# Altium PCB Pod_Islands_Panel.PcbDoc (part 4 of 10)
Units mm, origin at the board's own origin, x right, y up, seen from the top; angles counter-clockwise.
Board outline 95.7 x 83.7 mm, 6 copper layers (Top Layer, Inner1, Inner2, Inner3, Inner4, Bottom Layer), stack 0.82 mm thick; 1100 components, 940 nets, 4944 pads, 3680 vias.
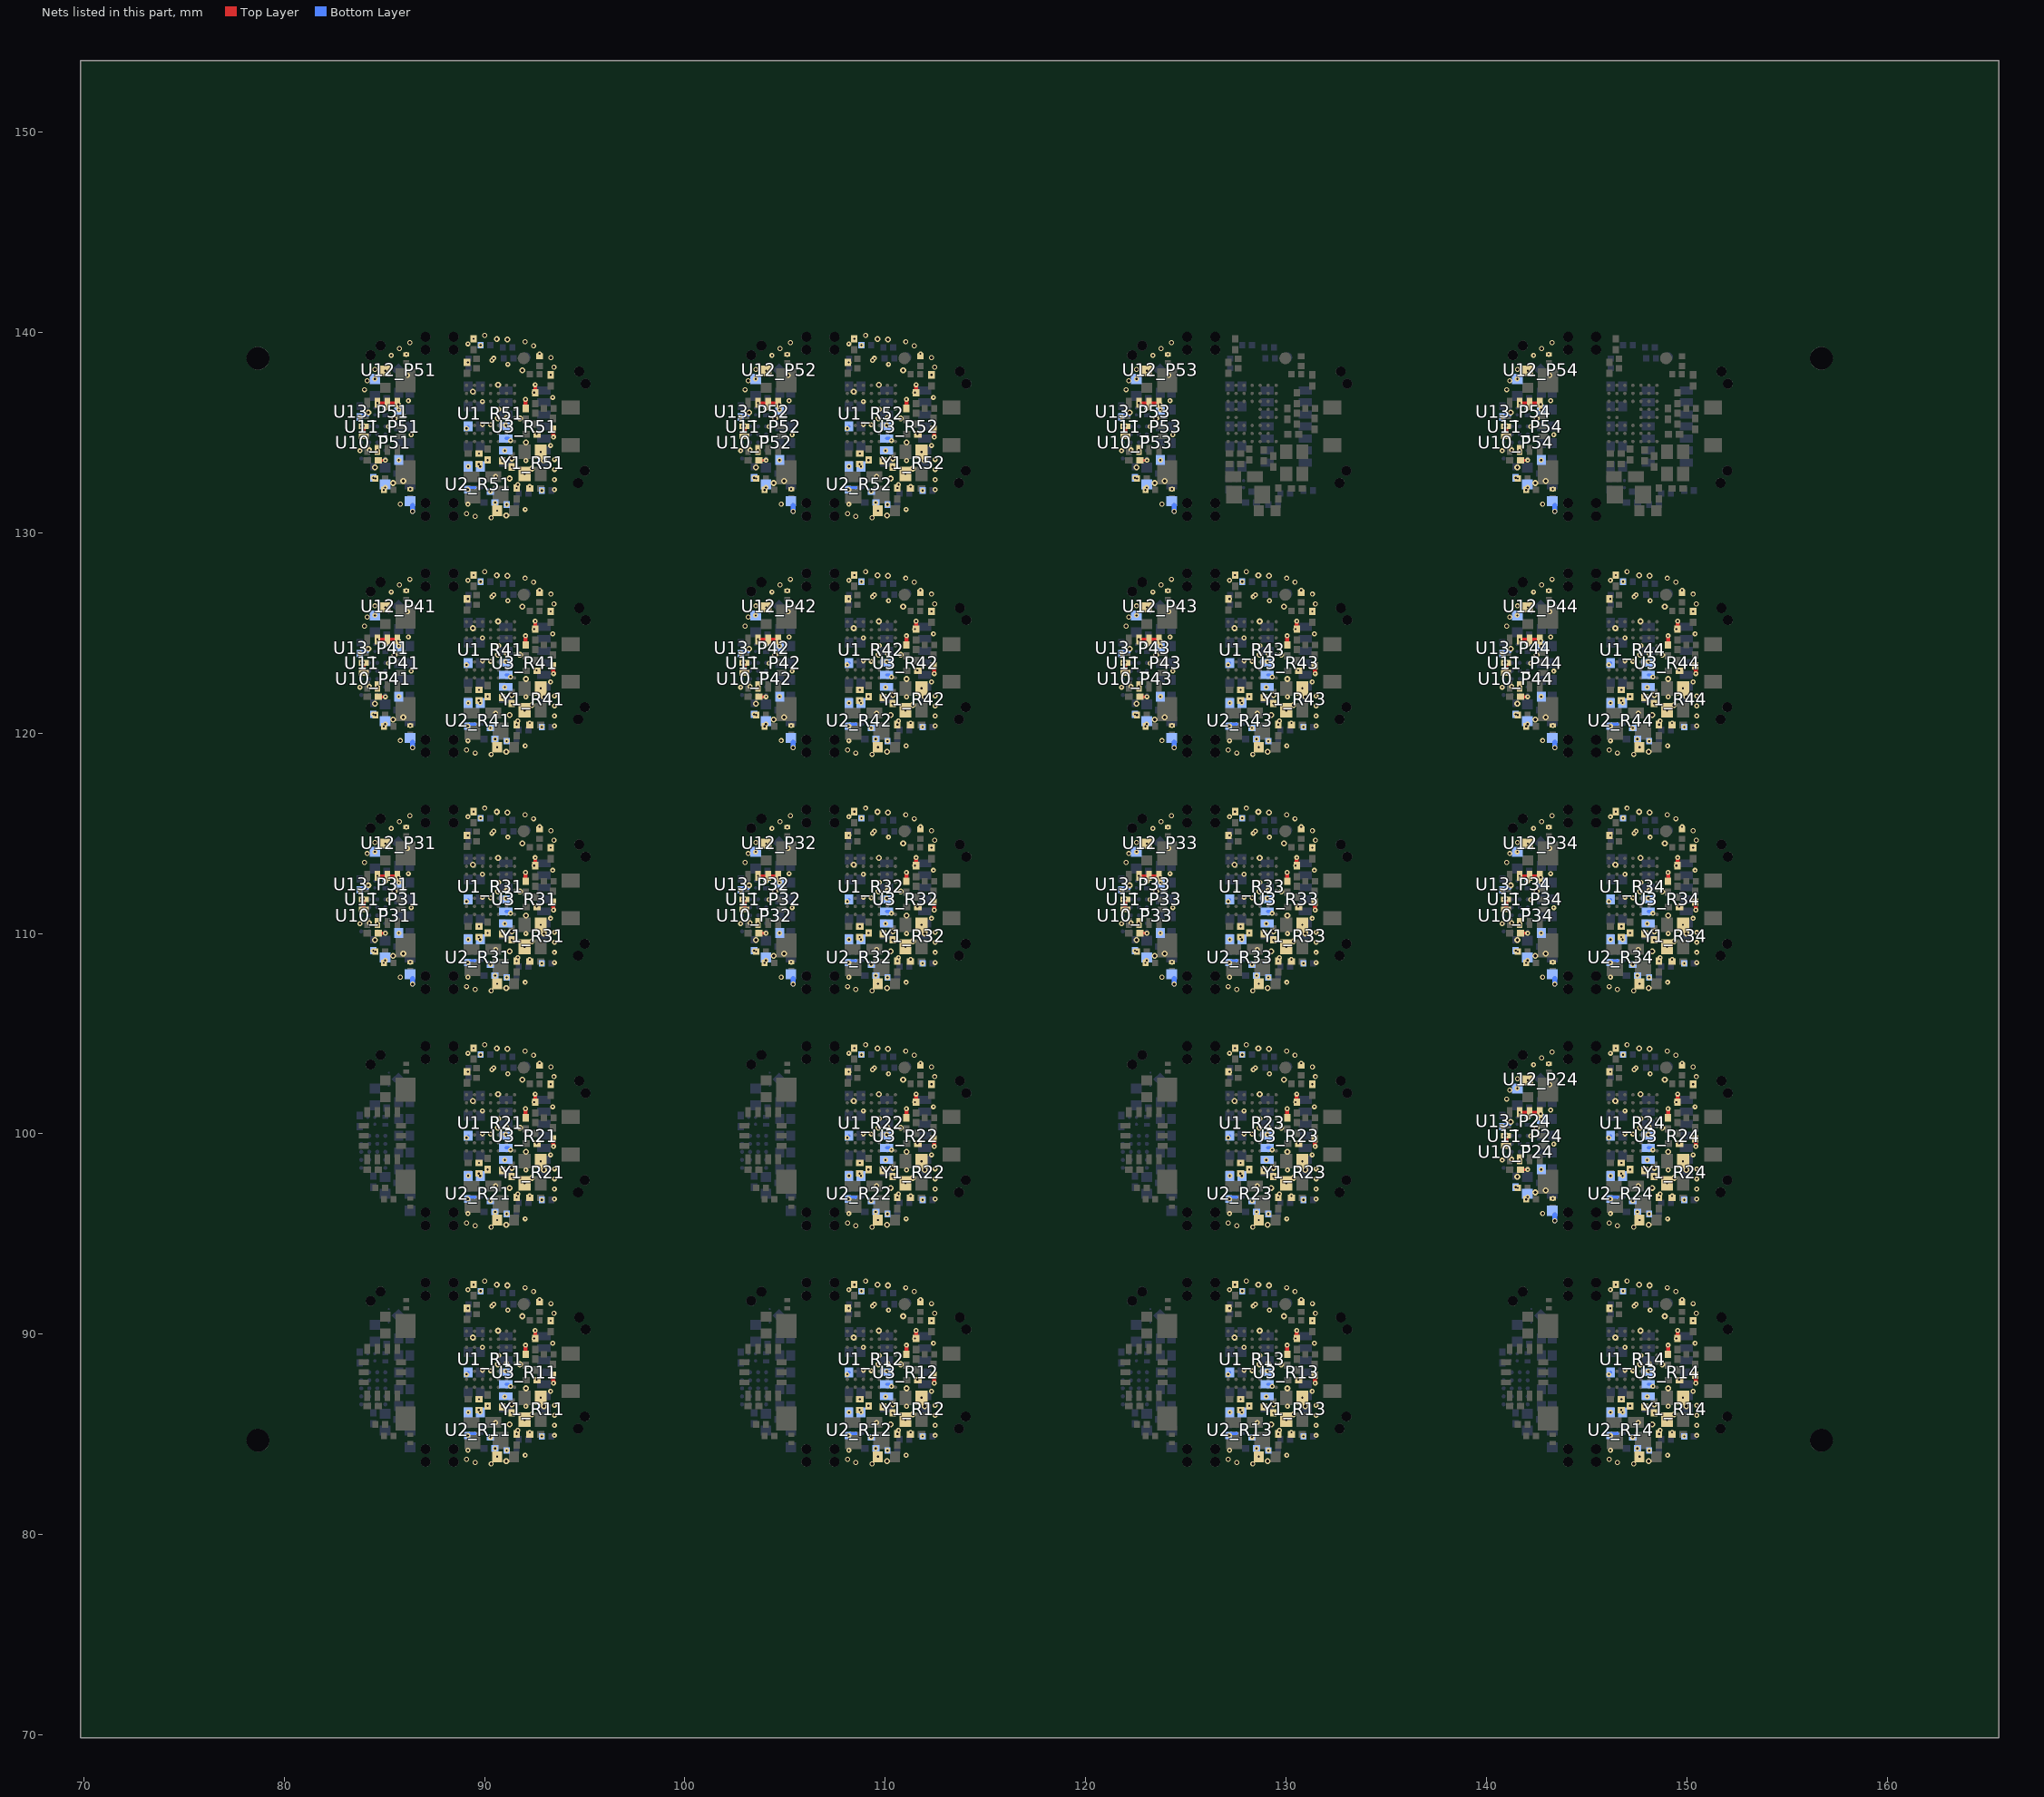
[diagram p8: the nets of this part, all layers, seen from the top]

## Via types
v1: diameter 0.249, hole 0.102, Top Layer to Inner1, 920 vias
v2: diameter 0.249, hole 0.102, Inner1 to Bottom Layer, 740 vias
v3: diameter 0.249, hole 0.102, Top Layer to Inner4, 580 vias
v4: diameter 0.249, hole 0.152, Top Layer to Bottom Layer, 540 vias
v5: diameter 0.249, hole 0.102, Inner4 to Bottom Layer, 520 vias
v6: diameter 0.3, hole 0.152, Inner1 to Inner4, 380 vias

## Nets (pads, with @x,y where several pads share a name; then routed paths per layer and width w, separated by ;. In a path a pad name is that pad's centre, name@x,y a point inside that pad or via, vN(x,y) a via of type N, cw(c..) or ccw(c..) an arc to the next point about the centre after c; other vN are vias at no path point) (continued)
GND_P24: C50_P24.2 C51_P24.2 C52_P24.2 C53_P24.2 C56_P24.2 C60_P24.2 C63_P24.2 D10_P24.2 D12_P24.2 D13_P24.2 pad.JP6@142.723,98.221 pad.JP9@142.723,100.741 R50_P24.2 TH5_P24.2 U10_P24.A4 U10_P24.D3 U11_P24.1 U11_P24.2 U11_P24.3 U11_P24.6 U11_P24.7 U11_P24.9 U12_P24.4 U13_P24.B2 | length 2.5
  Top Layer w0.15: v1(141.65,101.075) U11_P24.2@142.15,101.075 U11_P24.1@142.651,101.075 ; C60_P24.2@141.696,98.21 v1(142.05,98.21)
  Top Layer w0.2: U11_P24.7@140.974,99.399 140.974,99.899 v1(140.974,99.929)
  Bottom Layer w0.15: 140.942,100.476 U13_P24.B2@141.175,100.475 ; U10_P24.D3@141.251,98.7 v5(141.251,98.73) ; v5(142.051,100.8) D10_P24.2@142.051,100.849
  Bottom Layer w0.25: v4(143.404,95.667) C52_P24.2@143.404,95.95
  other v1: 141.977,96.729 143.301,96.77 141.558,97.301 140.78,98.687 141.651,98.724 143.344,99.487 142.2,99.887 142.7,101 143.2,101.187 142.051,102.677
  other v3: 142.345,103.443 143.1,103.501
  other v4: 142.8,96.02 141.004,101.736 141.15,102.187 141.534,102.745 142.75,103.787 143.268,104.076
  other v5: 142.041,96.85 141.449,97.336 142.724,98.22 140.85,99.899 140.779,100.367 142.724,100.74 141.531,102.269 143.15,102.45
  other v6: 142.431,97.076 142.944,97.185 141.535,97.864 142.499,100.289 141.2,100.6
GND_P31: C50_P31.2 C51_P31.2 C52_P31.2 C53_P31.2 C56_P31.2 C60_P31.2 C63_P31.2 D10_P31.2 D12_P31.2 D13_P31.2 pad.JP6@85.723,110.019 pad.JP9@85.723,112.539 R50_P31.2 TH5_P31.2 U10_P31.A4 U10_P31.D3 U11_P31.1 U11_P31.2 U11_P31.3 U11_P31.6 U11_P31.7 U11_P31.9 U12_P31.4 U13_P31.B2 | length 2.5
  Top Layer w0.15: v1(84.65,112.875) U11_P31.2@85.15,112.875 U11_P31.1@85.651,112.875 ; C60_P31.2@84.696,110.01 v1(85.05,110.01)
  Top Layer w0.2: U11_P31.7@83.975,111.2 U11_P31.6@83.975,111.7 v1(83.974,111.729)
  Bottom Layer w0.15: 83.942,112.276 U13_P31.B2@84.175,112.275 ; U10_P31.D3@84.251,110.5 v5(84.251,110.53) ; v5(85.051,112.6) D10_P31.2@85.051,112.649
  Bottom Layer w0.25: v4(86.404,107.467) C52_P31.2@86.404,107.75
  other v1: 84.977,108.529 86.301,108.57 84.558,109.101 83.78,110.487 84.651,110.525 86.344,111.287 85.2,111.687 85.7,112.8 86.2,112.987 85.051,114.477
  other v3: 85.345,115.243 86.1,115.301
  other v4: 85.8,107.82 84.004,113.536 84.15,113.987 84.534,114.545 85.75,115.587 86.268,115.876
  other v5: 85.041,108.65 84.449,109.136 85.724,110.02 83.85,111.699 83.779,112.167 85.724,112.54 84.531,114.069 86.15,114.25
  other v6: 85.431,108.876 85.944,108.985 84.535,109.664 85.499,112.089 84.2,112.4
GND_P32: C50_P32.2 C51_P32.2 C52_P32.2 C53_P32.2 C56_P32.2 C60_P32.2 C63_P32.2 D10_P32.2 D12_P32.2 D13_P32.2 pad.JP6@104.725,110.019 pad.JP9@104.725,112.539 R50_P32.2 TH5_P32.2 U10_P32.A4 U10_P32.D3 U11_P32.1 U11_P32.2 U11_P32.3 U11_P32.6 U11_P32.7 U11_P32.9 U12_P32.4 U13_P32.B2 | length 2.5
  Top Layer w0.15: v1(103.65,112.875) U11_P32.2@104.15,112.875 U11_P32.1@104.65,112.875 ; C60_P32.2@103.694,110.01 v1(104.05,110.01)
  Top Layer w0.2: U11_P32.7@102.975,111.2 U11_P32.6@102.975,111.7 v1(102.974,111.729)
  Bottom Layer w0.15: 102.942,112.276 U13_P32.B2@103.175,112.275 ; U10_P32.D3@103.25,110.5 v5(103.251,110.53) ; v5(104.051,112.6) D10_P32.2@104.05,112.65
  Bottom Layer w0.25: v4@105.404,107.467 C52_P32.2@105.404,107.75
  other v1: 103.977,108.529 105.301,108.57 103.558,109.101 102.78,110.487 103.65,110.525 105.344,111.287 104.2,111.687 104.7,112.8 105.2,112.987 104.051,114.477
  other v3: 104.345,115.243 105.1,115.301
  other v4: 105.404,107.467 104.8,107.82 103.004,113.536 103.15,113.987 103.534,114.545 104.75,115.587 105.268,115.876
  other v5: 104.041,108.65 103.449,109.136 104.724,110.02 102.85,111.699 102.779,112.167 104.724,112.54 103.531,114.069 105.15,114.25
  other v6: 104.431,108.876 104.944,108.985 103.535,109.664 104.499,112.089 103.2,112.4
GND_P33: C50_P33.2 C51_P33.2 C52_P33.2 C53_P33.2 C56_P33.2 C60_P33.2 C63_P33.2 D10_P33.2 D12_P33.2 D13_P33.2 pad.JP6@123.724,110.019 pad.JP9@123.724,112.539 R50_P33.2 TH5_P33.2 U10_P33.A4 U10_P33.D3 U11_P33.1 U11_P33.2 U11_P33.3 U11_P33.6 U11_P33.7 U11_P33.9 U12_P33.4 U13_P33.B2 | length 2.5
  Top Layer w0.15: v1(122.65,112.875) U11_P33.2@123.15,112.875 U11_P33.1@123.65,112.875 ; C60_P33.2@122.694,110.01 v1(123.05,110.01)
  Top Layer w0.2: U11_P33.7@121.974,111.199 121.974,111.699 v1(121.974,111.729)
  Bottom Layer w0.15: 121.942,112.276 U13_P33.B2@122.175,112.275 ; U10_P33.D3@122.25,110.5 v5(122.251,110.53) ; v5(123.051,112.6) D10_P33.2@123.05,112.65
  Bottom Layer w0.25: v4(124.404,107.467) C52_P33.2@124.404,107.75
  other v1: 122.977,108.529 124.301,108.57 122.558,109.101 121.78,110.487 122.649,110.525 124.344,111.287 123.2,111.687 123.7,112.8 124.2,112.987 123.051,114.477
  other v3: 123.345,115.243 124.1,115.301
  other v4: 123.8,107.82 122.004,113.536 122.15,113.987 122.534,114.545 123.75,115.587 124.268,115.876
  other v5: 123.041,108.65 122.449,109.136 123.724,110.02 121.85,111.699 121.779,112.167 123.724,112.54 122.531,114.069 124.15,114.25
  other v6: 123.431,108.876 123.944,108.985 122.535,109.664 123.499,112.089 122.2,112.4
GND_P34: C50_P34.2 C51_P34.2 C52_P34.2 C53_P34.2 C56_P34.2 C60_P34.2 C63_P34.2 D10_P34.2 D12_P34.2 D13_P34.2 pad.JP6@142.723,110.019 pad.JP9@142.723,112.539 R50_P34.2 TH5_P34.2 U10_P34.A4 U10_P34.D3 U11_P34.1 U11_P34.2 U11_P34.3 U11_P34.6 U11_P34.7 U11_P34.9 U12_P34.4 U13_P34.B2 | length 2.5
  Top Layer w0.15: v1(141.65,112.875) U11_P34.2@142.15,112.875 U11_P34.1@142.651,112.875 ; C60_P34.2@141.696,110.01 v1(142.05,110.01)
  Top Layer w0.2: U11_P34.7@140.975,111.2 U11_P34.6@140.975,111.7 v1(140.974,111.729)
  Bottom Layer w0.15: 140.942,112.276 U13_P34.B2@141.175,112.275 ; U10_P34.D3@141.251,110.5 v5(141.251,110.53) ; v5(142.051,112.6) D10_P34.2@142.051,112.649
  Bottom Layer w0.25: v4(143.404,107.467) C52_P34.2@143.404,107.75
  other v1: 141.977,108.529 143.301,108.57 141.558,109.101 140.78,110.487 141.651,110.525 143.344,111.287 142.2,111.687 142.7,112.8 143.2,112.987 142.051,114.477
  other v3: 142.345,115.243 143.1,115.301
  other v4: 142.8,107.82 141.004,113.536 141.15,113.987 141.534,114.545 142.75,115.587 143.268,115.876
  other v5: 142.041,108.65 141.449,109.136 142.724,110.02 140.85,111.699 140.779,112.167 142.724,112.54 141.531,114.069 143.15,114.25
  other v6: 142.431,108.876 142.944,108.985 141.535,109.664 142.499,112.089 141.2,112.4
GND_P41: C50_P41.2 C51_P41.2 C52_P41.2 C53_P41.2 C56_P41.2 C60_P41.2 C63_P41.2 D10_P41.2 D12_P41.2 D13_P41.2 pad.JP6@85.723,121.82 pad.JP9@85.723,124.34 R50_P41.2 TH5_P41.2 U10_P41.A4 U10_P41.D3 U11_P41.1 U11_P41.2 U11_P41.3 U11_P41.6 U11_P41.7 U11_P41.9 U12_P41.4 U13_P41.B2 | length 2.5
  Top Layer w0.15: v1(84.65,124.675) U11_P41.2@85.15,124.675 U11_P41.1@85.651,124.675 ; C60_P41.2@84.696,121.81 v1(85.05,121.81)
  Top Layer w0.2: U11_P41.7@83.975,123 U11_P41.6@83.975,123.5 v1(83.974,123.529)
  Bottom Layer w0.15: 83.942,124.076 U13_P41.B2@84.175,124.076 ; U10_P41.D3@84.251,122.3 v5(84.251,122.33) ; v5(85.051,124.4) D10_P41.2@85.051,124.449
  Bottom Layer w0.25: v4(86.404,119.267) C52_P41.2@86.404,119.55
  other v1: 84.977,120.329 86.301,120.37 84.558,120.901 83.78,122.287 84.651,122.326 86.344,123.087 85.2,123.487 85.7,124.6 86.2,124.787 85.051,126.277
  other v3: 85.345,127.043 86.1,127.101
  other v4: 85.8,119.62 84.004,125.336 84.15,125.787 84.534,126.345 85.75,127.387 86.268,127.676
  other v5: 85.041,120.45 84.449,120.936 85.724,121.82 83.85,123.499 83.779,123.967 85.724,124.34 84.531,125.869 86.15,126.05
  other v6: 85.431,120.676 85.944,120.785 84.535,121.464 85.499,123.889 84.2,124.2
GND_P42: C50_P42.2 C51_P42.2 C52_P42.2 C53_P42.2 C56_P42.2 C60_P42.2 C63_P42.2 D10_P42.2 D12_P42.2 D13_P42.2 pad.JP6@104.725,121.82 pad.JP9@104.725,124.34 R50_P42.2 TH5_P42.2 U10_P42.A4 U10_P42.D3 U11_P42.1 U11_P42.2 U11_P42.3 U11_P42.6 U11_P42.7 U11_P42.9 U12_P42.4 U13_P42.B2 | length 2.5
  Top Layer w0.15: v1(103.65,124.675) U11_P42.2@104.15,124.675 U11_P42.1@104.65,124.675 ; C60_P42.2@103.694,121.81 v1(104.05,121.81)
  Top Layer w0.2: U11_P42.7@102.975,123 U11_P42.6@102.975,123.5 v1(102.974,123.529)
  Bottom Layer w0.15: 102.942,124.076 U13_P42.B2@103.175,124.076 ; U10_P42.D3@103.25,122.3 v5(103.251,122.33) ; v5(104.051,124.4) D10_P42.2@104.05,124.45
  Bottom Layer w0.25: v4@105.404,119.267 C52_P42.2@105.404,119.55
  other v1: 103.977,120.329 105.301,120.37 103.558,120.901 102.78,122.287 103.65,122.326 105.344,123.087 104.2,123.487 104.7,124.6 105.2,124.787 104.051,126.277
  other v3: 104.345,127.043 105.1,127.101
  other v4: 105.404,119.267 104.8,119.62 103.004,125.336 103.15,125.787 103.534,126.345 104.75,127.387 105.268,127.676
  other v5: 104.041,120.45 103.449,120.936 104.724,121.82 102.85,123.499 102.779,123.967 104.724,124.34 103.531,125.869 105.15,126.05
  other v6: 104.431,120.676 104.944,120.785 103.535,121.464 104.499,123.889 103.2,124.2
GND_P43: C50_P43.2 C51_P43.2 C52_P43.2 C53_P43.2 C56_P43.2 C60_P43.2 C63_P43.2 D10_P43.2 D12_P43.2 D13_P43.2 pad.JP6@123.724,121.82 pad.JP9@123.724,124.34 R50_P43.2 TH5_P43.2 U10_P43.A4 U10_P43.D3 U11_P43.1 U11_P43.2 U11_P43.3 U11_P43.6 U11_P43.7 U11_P43.9 U12_P43.4 U13_P43.B2 | length 2.5
  Top Layer w0.15: v1(122.65,124.675) U11_P43.2@123.15,124.675 U11_P43.1@123.65,124.675 ; C60_P43.2@122.694,121.81 v1(123.05,121.81)
  Top Layer w0.2: U11_P43.7@121.974,122.999 121.974,123.499 v1(121.974,123.529)
  Bottom Layer w0.15: 121.942,124.076 U13_P43.B2@122.175,124.076 ; U10_P43.D3@122.25,122.3 v5(122.251,122.33) ; v5(123.051,124.4) D10_P43.2@123.05,124.45
  Bottom Layer w0.25: v4(124.404,119.267) C52_P43.2@124.404,119.55
  other v1: 122.977,120.329 124.301,120.37 122.558,120.901 121.78,122.287 122.649,122.326 124.344,123.087 123.2,123.487 123.7,124.6 124.2,124.787 123.051,126.277
  other v3: 123.345,127.043 124.1,127.101
  other v4: 123.8,119.62 122.004,125.336 122.15,125.787 122.534,126.345 123.75,127.387 124.268,127.676
  other v5: 123.041,120.45 122.449,120.936 123.724,121.82 121.85,123.499 121.779,123.967 123.724,124.34 122.531,125.869 124.15,126.05
  other v6: 123.431,120.676 123.944,120.785 122.535,121.464 123.499,123.889 122.2,124.2
GND_P44: C50_P44.2 C51_P44.2 C52_P44.2 C53_P44.2 C56_P44.2 C60_P44.2 C63_P44.2 D10_P44.2 D12_P44.2 D13_P44.2 pad.JP6@142.723,121.82 pad.JP9@142.723,124.34 R50_P44.2 TH5_P44.2 U10_P44.A4 U10_P44.D3 U11_P44.1 U11_P44.2 U11_P44.3 U11_P44.6 U11_P44.7 U11_P44.9 U12_P44.4 U13_P44.B2 | length 2.5
  Top Layer w0.15: v1(141.65,124.675) U11_P44.2@142.15,124.675 U11_P44.1@142.651,124.675 ; C60_P44.2@141.696,121.81 v1(142.05,121.81)
  Top Layer w0.2: U11_P44.7@140.975,123 U11_P44.6@140.975,123.5 v1(140.974,123.529)
  Bottom Layer w0.15: 140.942,124.076 U13_P44.B2@141.175,124.076 ; U10_P44.D3@141.251,122.3 v5(141.251,122.33) ; v5(142.051,124.4) D10_P44.2@142.051,124.449
  Bottom Layer w0.25: v4(143.404,119.267) C52_P44.2@143.404,119.55
  other v1: 141.977,120.329 143.301,120.37 141.558,120.901 140.78,122.287 141.651,122.326 143.344,123.087 142.2,123.487 142.7,124.6 143.2,124.787 142.051,126.277
  other v3: 142.345,127.043 143.1,127.101
  other v4: 142.8,119.62 141.004,125.336 141.15,125.787 141.534,126.345 142.75,127.387 143.268,127.676
  other v5: 142.041,120.45 141.449,120.936 142.724,121.82 140.85,123.499 140.779,123.967 142.724,124.34 141.531,125.869 143.15,126.05
  other v6: 142.431,120.676 142.944,120.785 141.535,121.464 142.499,123.889 141.2,124.2
GND_P51: C50_P51.2 C51_P51.2 C52_P51.2 C53_P51.2 C56_P51.2 C60_P51.2 C63_P51.2 D10_P51.2 D12_P51.2 D13_P51.2 pad.JP6@85.723,133.621 pad.JP9@85.723,136.141 R50_P51.2 TH5_P51.2 U10_P51.A4 U10_P51.D3 U11_P51.1 U11_P51.2 U11_P51.3 U11_P51.6 U11_P51.7 U11_P51.9 U12_P51.4 U13_P51.B2 | length 2.5
  Top Layer w0.15: v1(84.65,136.475) U11_P51.2@85.15,136.475 U11_P51.1@85.651,136.475 ; C60_P51.2@84.696,133.61 v1(85.05,133.61)
  Top Layer w0.2: U11_P51.7@83.974,134.799 83.974,135.299 v1(83.974,135.329)
  Bottom Layer w0.15: 83.942,135.876 U13_P51.B2@84.175,135.875 ; U10_P51.D3@84.251,134.1 v5(84.251,134.13) ; v5(85.051,136.2) D10_P51.2@85.051,136.249
  Bottom Layer w0.25: v4(86.404,131.067) C52_P51.2@86.404,131.35
  other v1: 84.977,132.129 86.301,132.17 84.558,132.701 83.78,134.087 84.651,134.124 86.344,134.887 85.2,135.287 85.7,136.4 86.2,136.587 85.051,138.077
  other v3: 85.345,138.843 86.1,138.901
  other v4: 85.8,131.42 84.004,137.136 84.15,137.587 84.534,138.145 85.75,139.187 86.268,139.476
  other v5: 85.041,132.25 84.449,132.736 85.724,133.62 83.85,135.299 83.779,135.767 85.724,136.14 84.531,137.669 86.15,137.85
  other v6: 85.431,132.476 85.944,132.585 84.535,133.264 85.499,135.689 84.2,136
GND_P52: C50_P52.2 C51_P52.2 C52_P52.2 C53_P52.2 C56_P52.2 C60_P52.2 C63_P52.2 D10_P52.2 D12_P52.2 D13_P52.2 pad.JP6@104.725,133.621 pad.JP9@104.725,136.141 R50_P52.2 TH5_P52.2 U10_P52.A4 U10_P52.D3 U11_P52.1 U11_P52.2 U11_P52.3 U11_P52.6 U11_P52.7 U11_P52.9 U12_P52.4 U13_P52.B2 | length 2.5
  Top Layer w0.15: v1(103.65,136.475) U11_P52.2@104.15,136.475 U11_P52.1@104.65,136.475 ; C60_P52.2@103.694,133.61 v1(104.05,133.61)
  Top Layer w0.2: U11_P52.7@102.974,134.799 102.974,135.299 v1(102.974,135.329)
  Bottom Layer w0.15: 102.942,135.876 U13_P52.B2@103.175,135.875 ; U10_P52.D3@103.25,134.1 v5(103.251,134.13) ; v5(104.051,136.2) D10_P52.2@104.051,136.249
  Bottom Layer w0.25: v4@105.404,131.067 C52_P52.2@105.404,131.35
  other v1: 103.977,132.129 105.301,132.17 103.558,132.701 102.78,134.087 103.65,134.124 105.344,134.887 104.2,135.287 104.7,136.4 105.2,136.587 104.051,138.077
  other v3: 104.345,138.843 105.1,138.901
  other v4: 105.404,131.067 104.8,131.42 103.004,137.136 103.15,137.587 103.534,138.145 104.75,139.187 105.268,139.476
  other v5: 104.041,132.25 103.449,132.736 104.724,133.62 102.85,135.299 102.779,135.767 104.724,136.14 103.531,137.669 105.15,137.85
  other v6: 104.431,132.476 104.944,132.585 103.535,133.264 104.499,135.689 103.2,136
GND_P53: C50_P53.2 C51_P53.2 C52_P53.2 C53_P53.2 C56_P53.2 C60_P53.2 C63_P53.2 D10_P53.2 D12_P53.2 D13_P53.2 pad.JP6@123.724,133.621 pad.JP9@123.724,136.141 R50_P53.2 TH5_P53.2 U10_P53.A4 U10_P53.D3 U11_P53.1 U11_P53.2 U11_P53.3 U11_P53.6 U11_P53.7 U11_P53.9 U12_P53.4 U13_P53.B2 | length 2.5
  Top Layer w0.15: v1(122.65,136.475) U11_P53.2@123.15,136.475 U11_P53.1@123.65,136.475 ; C60_P53.2@122.694,133.61 v1(123.05,133.61)
  Top Layer w0.2: U11_P53.7@121.974,134.799 121.974,135.299 v1(121.974,135.329)
  Bottom Layer w0.15: 121.942,135.876 U13_P53.B2@122.175,135.875 ; U10_P53.D3@122.25,134.1 v5(122.251,134.13) ; v5(123.051,136.2) D10_P53.2@123.051,136.249
  Bottom Layer w0.25: v4(124.404,131.067) C52_P53.2@124.404,131.35
  other v1: 122.977,132.129 124.301,132.17 122.558,132.701 121.78,134.087 122.649,134.124 124.344,134.887 123.2,135.287 123.7,136.4 124.2,136.587 123.051,138.077
  other v3: 123.345,138.843 124.1,138.901
  other v4: 123.8,131.42 122.004,137.136 122.15,137.587 122.534,138.145 123.75,139.187 124.268,139.476
  other v5: 123.041,132.25 122.449,132.736 123.724,133.62 121.85,135.299 121.779,135.767 123.724,136.14 122.531,137.669 124.15,137.85
  other v6: 123.431,132.476 123.944,132.585 122.535,133.264 123.499,135.689 122.2,136
GND_P54: C50_P54.2 C51_P54.2 C52_P54.2 C53_P54.2 C56_P54.2 C60_P54.2 C63_P54.2 D10_P54.2 D12_P54.2 D13_P54.2 pad.JP6@142.723,133.621 pad.JP9@142.723,136.141 R50_P54.2 TH5_P54.2 U10_P54.A4 U10_P54.D3 U11_P54.1 U11_P54.2 U11_P54.3 U11_P54.6 U11_P54.7 U11_P54.9 U12_P54.4 U13_P54.B2 | length 2.5
  Top Layer w0.15: v1(141.65,136.475) U11_P54.2@142.15,136.475 U11_P54.1@142.651,136.475 ; C60_P54.2@141.696,133.61 v1(142.05,133.61)
  Top Layer w0.2: U11_P54.7@140.974,134.799 140.974,135.299 v1(140.974,135.329)
  Bottom Layer w0.15: 140.942,135.876 U13_P54.B2@141.175,135.875 ; U10_P54.D3@141.251,134.1 v5(141.251,134.13) ; v5(142.051,136.2) D10_P54.2@142.051,136.249
  Bottom Layer w0.25: v4(143.404,131.067) C52_P54.2@143.404,131.35
  other v1: 141.977,132.129 143.301,132.17 141.558,132.701 140.78,134.087 141.651,134.124 143.344,134.887 142.2,135.287 142.7,136.4 143.2,136.587 142.051,138.077
  other v3: 142.345,138.843 143.1,138.901
  other v4: 142.8,131.42 141.004,137.136 141.15,137.587 141.534,138.145 142.75,139.187 143.268,139.476
  other v5: 142.041,132.25 141.449,132.736 142.724,133.62 140.85,135.299 140.779,135.767 142.724,136.14 141.531,137.669 143.15,137.85
  other v6: 142.431,132.476 142.944,132.585 141.535,133.264 142.499,135.689 141.2,136
GND_R11: C1_R11.2 C2_R11.2 C3_R11.2 C4_R11.2 C5_R11.2 C6_R11.2 C7_R11.2 C8_R11.2 C9_R11.2 C10_R11.2 C12_R11.2 C20_R11.2 C21_R11.2 C30_R11.2 C31_R11.2 C32_R11.2 C40_R11.2 C42_R11.2 pad.JR1@89.185,86.1 pad.JR3@89.185,88.099 pad.JR6@89.784,86.1 R5_R11.2 R41_R11.2 TH1_R11.2 TH4_R11.2 U1_R11.C4 U1_R11.C5 U1_R11.D2 U1_R11.E3 U1_R11.F5 U2_R11.B2 U3_R11.9 U3_R11.10 U3_R11.11 Y1_R11.2 Y1_R11.4 | length 2.1
  Top Layer w0.15: U1_R11.C4@90.3,88.15 v1(90.3,88.18)
  Top Layer w0.2: C3_R11.2@92.05,89.001 v1(92.05,89.45) ; C42_R11.2@92.53,89.786 v1(92.53,90.186) ; C40_R11.2@93.411,87.955 v1(93.442,87.564)
  Bottom Layer w0.15: v5(89.1,88) 89.185,88.085 pad.JR3@89.185,88.099 ; v2(89.176,84.947) 89.228,85.046 U2_R11.B2@89.525,85.046 ; U3_R11.10@91.06,87.5 91.2,87.5 v5(91.3,87.4)
  other v1: 90.63,83.89 92.03,83.96 93.485,84.95 91.601,85.023 92.256,85.1 93.485,85.45 91.999,85.729 93.485,85.95 91.359,86.075 89.718,86.22 90.88,86.377 90.16,86.423 93.485,86.45 89.723,86.75 92.799,86.831 93.3,87.15 92.6,87.73 89.899,88.21 91.1,88.551 90.699,88.95 89.899,89.349 93.4,89.55 92.47,89.786 93.3,90.675 91.16,91.2 89.172,91.294 90.36,91.4
  other v2: 89.176,84.215 89.176,92.22
  other v3: 92.751,91.722 89.449,92.476
  other v4: 90.336,83.539 89.529,83.606 89.11,83.75 93.46,91.05 93.306,91.531 92.442,92.125 92.021,92.323 90.01,92.65
  other v5: 92.03,83.96 91.108,84.2 90.524,84.299 90.295,84.85 92.858,84.901 91.66,85.2 90.56,85.6 89.185,86.1 89.784,86.1 92.06,86.4 91.01,86.89 91.06,88.159 90.46,91.5 89.807,92.15
  other v6: 91.081,83.665 91.26,85.5 92.36,86 92.96,86.4 91.37,86.5 92.06,87.3 90.66,88.5 91.76,88.5 89.42,89.835 90.676,90.174 91.89,90.9 91.135,92.439 90.611,92.469
GND_R12: C1_R12.2 C2_R12.2 C3_R12.2 C4_R12.2 C5_R12.2 C6_R12.2 C7_R12.2 C8_R12.2 C9_R12.2 C10_R12.2 C12_R12.2 C20_R12.2 C21_R12.2 C30_R12.2 C31_R12.2 C32_R12.2 C40_R12.2 C42_R12.2 pad.JR1@108.184,86.1 pad.JR3@108.184,88.099 pad.JR6@108.784,86.1 R5_R12.2 R41_R12.2 TH1_R12.2 TH4_R12.2 U1_R12.C4 U1_R12.C5 U1_R12.D2 U1_R12.E3 U1_R12.F5 U2_R12.B2 U3_R12.9 U3_R12.10 U3_R12.11 Y1_R12.2 Y1_R12.4 | length 2.1
  Top Layer w0.15: U1_R12.C4@109.3,88.15 v1(109.3,88.18)
  Top Layer w0.2: C3_R12.2@111.05,89.001 v1(111.05,89.45) ; C42_R12.2@111.53,89.786 v1(111.53,90.186) ; C40_R12.2@112.412,87.954 v1(112.442,87.564)
  Bottom Layer w0.15: v5(108.1,88) 108.185,88.085 pad.JR3@108.185,88.099 ; v2(108.176,84.947) 108.228,85.046 U2_R12.B2@108.525,85.046 ; U3_R12.10@110.06,87.5 110.2,87.5 v5(110.3,87.4)
  other v1: 109.63,83.89 111.03,83.96 112.485,84.95 110.601,85.023 111.256,85.1 112.485,85.45 110.999,85.729 112.485,85.95 110.359,86.075 108.718,86.22 109.88,86.377 109.16,86.423 112.485,86.45 108.723,86.75 111.799,86.831 112.3,87.15 111.6,87.73 108.899,88.21 110.1,88.551 109.699,88.95 108.899,89.349 112.4,89.55 111.47,89.786 112.3,90.675 110.16,91.2 108.172,91.294 109.36,91.4
  other v2: 108.176,84.215 108.176,92.22
  other v3: 111.751,91.722 108.449,92.476
  other v4: 109.336,83.539 108.529,83.606 108.11,83.75 112.46,91.05 112.306,91.531 111.442,92.125 111.021,92.323 109.01,92.65
  other v5: 111.03,83.96 110.108,84.2 109.524,84.299 109.295,84.85 111.858,84.901 110.66,85.2 109.56,85.6 108.185,86.1 108.784,86.1 111.06,86.4 110.01,86.89 110.06,88.159 109.46,91.5 108.807,92.15
  other v6: 110.081,83.665 110.26,85.5 111.36,86 111.96,86.4 110.37,86.5 111.06,87.3 109.66,88.5 110.76,88.5 108.42,89.835 109.676,90.174 110.89,90.9 110.135,92.439 109.611,92.469
GND_R13: C1_R13.2 C2_R13.2 C3_R13.2 C4_R13.2 C5_R13.2 C6_R13.2 C7_R13.2 C8_R13.2 C9_R13.2 C10_R13.2 C12_R13.2 C20_R13.2 C21_R13.2 C30_R13.2 C31_R13.2 C32_R13.2 C40_R13.2 C42_R13.2 pad.JR1@127.186,86.1 pad.JR3@127.186,88.099 pad.JR6@127.785,86.1 R5_R13.2 R41_R13.2 TH1_R13.2 TH4_R13.2 U1_R13.C4 U1_R13.C5 U1_R13.D2 U1_R13.E3 U1_R13.F5 U2_R13.B2 U3_R13.9 U3_R13.10 U3_R13.11 Y1_R13.2 Y1_R13.4 | length 2.1
  Top Layer w0.15: U1_R13.C4@128.3,88.15 v1(128.3,88.18)
  Top Layer w0.2: C3_R13.2@130.05,89.001 v1(130.05,89.45) ; C42_R13.2@130.53,89.786 v1(130.53,90.186) ; C40_R13.2@131.411,87.955 v1(131.442,87.564)
  Bottom Layer w0.15: v5(127.1,88) 127.185,88.085 pad.JR3@127.186,88.099 ; v2(127.176,84.947) 127.228,85.046 U2_R13.B2@127.525,85.046 ; U3_R13.10@129.06,87.5 129.2,87.5 v5(129.3,87.4)
  other v1: 128.63,83.89 130.03,83.96 131.485,84.95 129.601,85.023 130.256,85.1 131.485,85.45 129.999,85.729 131.485,85.95 129.359,86.075 127.718,86.22 128.88,86.377 128.16,86.423 131.485,86.45 127.723,86.75 130.799,86.831 131.3,87.15 130.6,87.73 127.899,88.21 129.1,88.551 128.699,88.95 127.899,89.349 131.4,89.55 130.47,89.786 131.3,90.675 129.16,91.2 127.172,91.294 128.36,91.4
  other v2: 127.176,84.215 127.176,92.22
  other v3: 130.751,91.722 127.449,92.476
  other v4: 128.336,83.539 127.529,83.606 127.11,83.75 131.46,91.05 131.306,91.531 130.442,92.125 130.021,92.323 128.01,92.65
  other v5: 130.03,83.96 129.108,84.2 128.524,84.299 128.295,84.85 130.858,84.901 129.66,85.2 128.56,85.6 127.185,86.1 127.784,86.1 130.06,86.4 129.01,86.89 129.06,88.159 128.46,91.5 127.807,92.15
  other v6: 129.081,83.665 129.26,85.5 130.36,86 130.96,86.4 129.37,86.5 130.06,87.3 128.66,88.5 129.76,88.5 127.42,89.835 128.676,90.174 129.89,90.9 129.135,92.439 128.611,92.469
GND_R14: C1_R14.2 C2_R14.2 C3_R14.2 C4_R14.2 C5_R14.2 C6_R14.2 C7_R14.2 C8_R14.2 C9_R14.2 C10_R14.2 C12_R14.2 C20_R14.2 C21_R14.2 C30_R14.2 C31_R14.2 C32_R14.2 C40_R14.2 C42_R14.2 pad.JR1@146.185,86.1 pad.JR3@146.185,88.099 pad.JR6@146.785,86.1 R5_R14.2 R41_R14.2 TH1_R14.2 TH4_R14.2 U1_R14.C4 U1_R14.C5 U1_R14.D2 U1_R14.E3 U1_R14.F5 U2_R14.B2 U3_R14.9 U3_R14.10 U3_R14.11 Y1_R14.2 Y1_R14.4 | length 2.1
  Top Layer w0.15: U1_R14.C4@147.3,88.15 v1(147.3,88.18)
  Top Layer w0.2: C3_R14.2@149.05,89.001 v1(149.05,89.45) ; C42_R14.2@149.53,89.786 v1(149.53,90.186) ; C40_R14.2@150.411,87.955 v1(150.442,87.564)
  Bottom Layer w0.15: v5(146.1,88) 146.185,88.085 pad.JR3@146.185,88.099 ; v2(146.176,84.947) 146.228,85.046 U2_R14.B2@146.525,85.046 ; U3_R14.10@148.06,87.5 148.2,87.5 v5(148.3,87.4)
  other v1: 147.63,83.89 149.03,83.96 150.485,84.95 148.601,85.023 149.256,85.1 150.485,85.45 148.999,85.729 150.485,85.95 148.359,86.075 146.718,86.22 147.88,86.377 147.16,86.423 150.485,86.45 146.723,86.75 149.799,86.831 150.3,87.15 149.6,87.73 146.899,88.21 148.1,88.551 147.699,88.95 146.899,89.349 150.4,89.55 149.47,89.786 150.3,90.675 148.16,91.2 146.172,91.294 147.36,91.4
  other v2: 146.176,84.215 146.176,92.22
  other v3: 149.751,91.722 146.449,92.476
  other v4: 147.336,83.539 146.529,83.606 146.11,83.75 150.46,91.05 150.306,91.531 149.442,92.125 149.021,92.323 147.01,92.65
  other v5: 149.03,83.96 148.108,84.2 147.524,84.299 147.295,84.85 149.858,84.901 148.66,85.2 147.56,85.6 146.185,86.1 146.784,86.1 149.06,86.4 148.01,86.89 148.06,88.159 147.46,91.5 146.807,92.15
  other v6: 148.081,83.665 148.26,85.5 149.36,86 149.96,86.4 148.37,86.5 149.06,87.3 147.66,88.5 148.76,88.5 146.42,89.835 147.676,90.174 148.89,90.9 148.135,92.439 147.611,92.469
GND_R21: C1_R21.2 C2_R21.2 C3_R21.2 C4_R21.2 C5_R21.2 C6_R21.2 C7_R21.2 C8_R21.2 C9_R21.2 C10_R21.2 C12_R21.2 C20_R21.2 C21_R21.2 C30_R21.2 C31_R21.2 C32_R21.2 C40_R21.2 C42_R21.2 pad.JR1@89.185,97.901 pad.JR3@89.185,99.9 pad.JR6@89.784,97.901 R5_R21.2 R41_R21.2 TH1_R21.2 TH4_R21.2 U1_R21.C4 U1_R21.C5 U1_R21.D2 U1_R21.E3 U1_R21.F5 U2_R21.B2 U3_R21.9 U3_R21.10 U3_R21.11 Y1_R21.2 Y1_R21.4 | length 2.1
  Top Layer w0.15: U1_R21.C4@90.3,99.95 v1(90.3,99.98)
  Top Layer w0.2: C3_R21.2@92.05,100.801 v1(92.05,101.25) ; C42_R21.2@92.53,101.586 v1(92.53,101.986) ; C40_R21.2@93.412,99.754 v1(93.442,99.364)
  Bottom Layer w0.15: v5(89.1,99.8) 89.185,99.885 pad.JR3@89.185,99.899 ; v2(89.176,96.747) 89.228,96.846 U2_R21.B2@89.525,96.845 ; U3_R21.10@91.06,99.3 91.2,99.3 v5(91.3,99.2)
  other v1: 90.63,95.69 92.03,95.76 93.485,96.75 91.601,96.823 92.256,96.9 93.485,97.25 91.999,97.529 93.485,97.75 91.359,97.875 89.718,98.02 90.88,98.177 90.16,98.223 93.485,98.25 89.723,98.55 92.799,98.631 93.3,98.95 92.6,99.53 89.899,100.01 91.1,100.351 90.699,100.75 89.899,101.149 93.4,101.35 92.47,101.586 93.3,102.475 91.16,103 89.172,103.094 90.36,103.2
  other v2: 89.176,96.015 89.176,104.02
  other v3: 92.751,103.522 89.449,104.276
  other v4: 90.336,95.339 89.529,95.406 89.11,95.55 93.46,102.85 93.306,103.331 92.442,103.925 92.021,104.123 90.01,104.45
  other v5: 92.03,95.76 91.108,96 90.524,96.099 90.295,96.65 92.858,96.701 91.66,97 90.56,97.4 89.185,97.9 89.784,97.9 92.06,98.2 91.01,98.69 91.06,99.959 90.46,103.3 89.807,103.95
  other v6: 91.081,95.465 91.26,97.3 92.36,97.8 92.96,98.2 91.37,98.3 92.06,99.1 90.66,100.3 91.76,100.3 89.42,101.635 90.676,101.974 91.89,102.7 91.135,104.239 90.611,104.269
GND_R22: C1_R22.2 C2_R22.2 C3_R22.2 C4_R22.2 C5_R22.2 C6_R22.2 C7_R22.2 C8_R22.2 C9_R22.2 C10_R22.2 C12_R22.2 C20_R22.2 C21_R22.2 C30_R22.2 C31_R22.2 C32_R22.2 C40_R22.2 C42_R22.2 pad.JR1@108.184,97.901 pad.JR3@108.184,99.9 pad.JR6@108.784,97.901 R5_R22.2 R41_R22.2 TH1_R22.2 TH4_R22.2 U1_R22.C4 U1_R22.C5 U1_R22.D2 U1_R22.E3 U1_R22.F5 U2_R22.B2 U3_R22.9 U3_R22.10 U3_R22.11 Y1_R22.2 Y1_R22.4 | length 2.1
  Top Layer w0.15: U1_R22.C4@109.3,99.95 v1(109.3,99.98)
  Top Layer w0.2: C3_R22.2@111.05,100.801 v1(111.05,101.25) ; C42_R22.2@111.53,101.586 v1(111.53,101.986) ; C40_R22.2@112.412,99.754 v1(112.442,99.364)
  Bottom Layer w0.15: v5(108.1,99.8) 108.185,99.885 pad.JR3@108.185,99.899 ; v2(108.176,96.747) 108.228,96.846 U2_R22.B2@108.525,96.845 ; U3_R22.10@110.06,99.3 110.2,99.3 v5(110.3,99.2)
  other v1: 109.63,95.69 111.03,95.76 112.485,96.75 110.601,96.823 111.256,96.9 112.485,97.25 110.999,97.529 112.485,97.75 110.359,97.875 108.718,98.02 109.88,98.177 109.16,98.223 112.485,98.25 108.723,98.55 111.799,98.631 112.3,98.95 111.6,99.53 108.899,100.01 110.1,100.351 109.699,100.75 108.899,101.149 112.4,101.35 111.47,101.586 112.3,102.475 110.16,103 108.172,103.094 109.36,103.2
  other v2: 108.176,96.015 108.176,104.02
  other v3: 111.751,103.522 108.449,104.276
  other v4: 109.336,95.339 108.529,95.406 108.11,95.55 112.46,102.85 112.306,103.331 111.442,103.925 111.021,104.123 109.01,104.45
  other v5: 111.03,95.76 110.108,96 109.524,96.099 109.295,96.65 111.858,96.701 110.66,97 109.56,97.4 108.185,97.9 108.784,97.9 111.06,98.2 110.01,98.69 110.06,99.959 109.46,103.3 108.807,103.95
  other v6: 110.081,95.465 110.26,97.3 111.36,97.8 111.96,98.2 110.37,98.3 111.06,99.1 109.66,100.3 110.76,100.3 108.42,101.635 109.676,101.974 110.89,102.7 110.135,104.239 109.611,104.269
GND_R23: C1_R23.2 C2_R23.2 C3_R23.2 C4_R23.2 C5_R23.2 C6_R23.2 C7_R23.2 C8_R23.2 C9_R23.2 C10_R23.2 C12_R23.2 C20_R23.2 C21_R23.2 C30_R23.2 C31_R23.2 C32_R23.2 C40_R23.2 C42_R23.2 pad.JR1@127.186,97.901 pad.JR3@127.186,99.9 pad.JR6@127.785,97.901 R5_R23.2 R41_R23.2 TH1_R23.2 TH4_R23.2 U1_R23.C4 U1_R23.C5 U1_R23.D2 U1_R23.E3 U1_R23.F5 U2_R23.B2 U3_R23.9 U3_R23.10 U3_R23.11 Y1_R23.2 Y1_R23.4 | length 2.1
  Top Layer w0.15: U1_R23.C4@128.3,99.95 v1(128.3,99.98)
  Top Layer w0.2: C3_R23.2@130.05,100.801 v1(130.05,101.25) ; C42_R23.2@130.53,101.586 v1(130.53,101.986) ; C40_R23.2@131.412,99.754 v1(131.442,99.364)
  Bottom Layer w0.15: v5(127.1,99.8) 127.185,99.885 pad.JR3@127.185,99.899 ; v2(127.176,96.747) 127.228,96.846 U2_R23.B2@127.525,96.845 ; U3_R23.10@129.06,99.3 129.2,99.3 v5(129.3,99.2)
  other v1: 128.63,95.69 130.03,95.76 131.485,96.75 129.601,96.823 130.256,96.9 131.485,97.25 129.999,97.529 131.485,97.75 129.359,97.875 127.718,98.02 128.88,98.177 128.16,98.223 131.485,98.25 127.723,98.55 130.799,98.631 131.3,98.95 130.6,99.53 127.899,100.01 129.1,100.351 128.699,100.75 127.899,101.149 131.4,101.35 130.47,101.586 131.3,102.475 129.16,103 127.172,103.094 128.36,103.2
  other v2: 127.176,96.015 127.176,104.02
  other v3: 130.751,103.522 127.449,104.276
  other v4: 128.336,95.339 127.529,95.406 127.11,95.55 131.46,102.85 131.306,103.331 130.442,103.925 130.021,104.123 128.01,104.45
  other v5: 130.03,95.76 129.108,96 128.524,96.099 128.295,96.65 130.858,96.701 129.66,97 128.56,97.4 127.185,97.9 127.784,97.9 130.06,98.2 129.01,98.69 129.06,99.959 128.46,103.3 127.807,103.95
  other v6: 129.081,95.465 129.26,97.3 130.36,97.8 130.96,98.2 129.37,98.3 130.06,99.1 128.66,100.3 129.76,100.3 127.42,101.635 128.676,101.974 129.89,102.7 129.135,104.239 128.611,104.269
GND_R24: C1_R24.2 C2_R24.2 C3_R24.2 C4_R24.2 C5_R24.2 C6_R24.2 C7_R24.2 C8_R24.2 C9_R24.2 C10_R24.2 C12_R24.2 C20_R24.2 C21_R24.2 C30_R24.2 C31_R24.2 C32_R24.2 C40_R24.2 C42_R24.2 pad.JR1@146.185,97.901 pad.JR3@146.185,99.9 pad.JR6@146.785,97.901 R5_R24.2 R41_R24.2 TH1_R24.2 TH4_R24.2 U1_R24.C4 U1_R24.C5 U1_R24.D2 U1_R24.E3 U1_R24.F5 U2_R24.B2 U3_R24.9 U3_R24.10 U3_R24.11 Y1_R24.2 Y1_R24.4 | length 2.1
  Top Layer w0.15: U1_R24.C4@147.3,99.95 v1(147.3,99.98)
  Top Layer w0.2: C3_R24.2@149.05,100.801 v1(149.05,101.25) ; C42_R24.2@149.53,101.586 v1(149.53,101.986) ; C40_R24.2@150.412,99.754 v1(150.442,99.364)
  Bottom Layer w0.15: v5(146.1,99.8) 146.185,99.885 pad.JR3@146.185,99.899 ; v2(146.176,96.747) 146.228,96.846 U2_R24.B2@146.525,96.845 ; U3_R24.10@148.06,99.3 148.2,99.3 v5(148.3,99.2)
  other v1: 147.63,95.69 149.03,95.76 150.485,96.75 148.601,96.823 149.256,96.9 150.485,97.25 148.999,97.529 150.485,97.75 148.359,97.875 146.718,98.02 147.88,98.177 147.16,98.223 150.485,98.25 146.723,98.55 149.799,98.631 150.3,98.95 149.6,99.53 146.899,100.01 148.1,100.351 147.699,100.75 146.899,101.149 150.4,101.35 149.47,101.586 150.3,102.475 148.16,103 146.172,103.094 147.36,103.2
  other v2: 146.176,96.015 146.176,104.02
  other v3: 149.751,103.522 146.449,104.276
  other v4: 147.336,95.339 146.529,95.406 146.11,95.55 150.46,102.85 150.306,103.331 149.442,103.925 149.021,104.123 147.01,104.45
  other v5: 149.03,95.76 148.108,96 147.524,96.099 147.295,96.65 149.858,96.701 148.66,97 147.56,97.4 146.185,97.9 146.784,97.9 149.06,98.2 148.01,98.69 148.06,99.959 147.46,103.3 146.807,103.95
  other v6: 148.081,95.465 148.26,97.3 149.36,97.8 149.96,98.2 148.37,98.3 149.06,99.1 147.66,100.3 148.76,100.3 146.42,101.635 147.676,101.974 148.89,102.7 148.135,104.239 147.611,104.269
GND_R31: C1_R31.2 C2_R31.2 C3_R31.2 C4_R31.2 C5_R31.2 C6_R31.2 C7_R31.2 C8_R31.2 C9_R31.2 C10_R31.2 C12_R31.2 C20_R31.2 C21_R31.2 C30_R31.2 C31_R31.2 C32_R31.2 C40_R31.2 C42_R31.2 pad.JR1@89.185,109.699 pad.JR3@89.185,111.698 pad.JR6@89.784,109.699 R5_R31.2 R41_R31.2 TH1_R31.2 TH4_R31.2 U1_R31.C4 U1_R31.C5 U1_R31.D2 U1_R31.E3 U1_R31.F5 U2_R31.B2 U3_R31.9 U3_R31.10 U3_R31.11 Y1_R31.2 Y1_R31.4 | length 2.1
  Top Layer w0.15: U1_R31.C4@90.3,111.75 v1(90.3,111.78)
  Top Layer w0.2: C3_R31.2@92.05,112.601 v1(92.05,113.05) ; C42_R31.2@92.53,113.386 v1(92.53,113.786) ; C40_R31.2@93.411,111.555 v1(93.442,111.164)
  Bottom Layer w0.15: v5(89.1,111.6) 89.185,111.685 pad.JR3@89.185,111.698 ; v2(89.176,108.547) 89.228,108.646 U2_R31.B2@89.525,108.645 ; U3_R31.10@91.06,111.1 91.2,111.1 v5(91.3,111)
  other v1: 90.63,107.49 92.03,107.56 93.485,108.55 91.601,108.623 92.256,108.7 93.485,109.05 91.999,109.329 93.485,109.55 91.359,109.675 89.718,109.82 90.88,109.977 90.16,110.023 93.485,110.05 89.723,110.35 92.799,110.431 93.3,110.75 92.6,111.33 89.899,111.81 91.1,112.151 90.699,112.55 89.899,112.949 93.4,113.15 92.47,113.386 93.3,114.275 91.16,114.8 89.172,114.894 90.36,115
  other v2: 89.176,107.815 89.176,115.82
  other v3: 92.751,115.322 89.449,116.076
  other v4: 90.336,107.139 89.529,107.206 89.11,107.35 93.46,114.65 93.306,115.131 92.442,115.725 92.021,115.923 90.01,116.25
  other v5: 92.03,107.56 91.108,107.8 90.524,107.899 90.295,108.45 92.858,108.501 91.66,108.8 90.56,109.2 89.185,109.7 89.784,109.7 92.06,110 91.01,110.49 91.06,111.759 90.46,115.1 89.807,115.75
  other v6: 91.081,107.265 91.26,109.1 92.36,109.6 92.96,110 91.37,110.1 92.06,110.9 90.66,112.1 91.76,112.1 89.42,113.435 90.676,113.774 91.89,114.5 91.135,116.039 90.611,116.069
GND_R32: C1_R32.2 C2_R32.2 C3_R32.2 C4_R32.2 C5_R32.2 C6_R32.2 C7_R32.2 C8_R32.2 C9_R32.2 C10_R32.2 C12_R32.2 C20_R32.2 C21_R32.2 C30_R32.2 C31_R32.2 C32_R32.2 C40_R32.2 C42_R32.2 pad.JR1@108.184,109.699 pad.JR3@108.184,111.698 pad.JR6@108.784,109.699 R5_R32.2 R41_R32.2 TH1_R32.2 TH4_R32.2 U1_R32.C4 U1_R32.C5 U1_R32.D2 U1_R32.E3 U1_R32.F5 U2_R32.B2 U3_R32.9 U3_R32.10 U3_R32.11 Y1_R32.2 Y1_R32.4 | length 2.1
  Top Layer w0.15: U1_R32.C4@109.3,111.75 v1(109.3,111.78)
  Top Layer w0.2: C3_R32.2@111.05,112.601 v1(111.05,113.05) ; C42_R32.2@111.53,113.386 v1(111.53,113.786) ; C40_R32.2@112.412,111.554 v1(112.442,111.164)
  Bottom Layer w0.15: v5(108.1,111.6) 108.185,111.685 pad.JR3@108.185,111.699 ; v2(108.176,108.547) 108.228,108.646 U2_R32.B2@108.525,108.645 ; U3_R32.10@110.06,111.1 110.2,111.1 v5(110.3,111)
  other v1: 109.63,107.49 111.03,107.56 112.485,108.55 110.601,108.623 111.256,108.7 112.485,109.05 110.999,109.329 112.485,109.55 110.359,109.675 108.718,109.82 109.88,109.977 109.16,110.023 112.485,110.05 108.723,110.35 111.799,110.431 112.3,110.75 111.6,111.33 108.899,111.81 110.1,112.151 109.699,112.55 108.899,112.949 112.4,113.15 111.47,113.386 112.3,114.275 110.16,114.8 108.172,114.894 109.36,115
  other v2: 108.176,107.815 108.176,115.82
  other v3: 111.751,115.322 108.449,116.076
  other v4: 109.336,107.139 108.529,107.206 108.11,107.35 112.46,114.65 112.306,115.131 111.442,115.725 111.021,115.923 109.01,116.25
  other v5: 111.03,107.56 110.108,107.8 109.524,107.899 109.295,108.45 111.858,108.501 110.66,108.8 109.56,109.2 108.185,109.7 108.784,109.7 111.06,110 110.01,110.49 110.06,111.759 109.46,115.1 108.807,115.75
  other v6: 110.081,107.265 110.26,109.1 111.36,109.6 111.96,110 110.37,110.1 111.06,110.9 109.66,112.1 110.76,112.1 108.42,113.435 109.676,113.774 110.89,114.5 110.135,116.039 109.611,116.069
GND_R33: C1_R33.2 C2_R33.2 C3_R33.2 C4_R33.2 C5_R33.2 C6_R33.2 C7_R33.2 C8_R33.2 C9_R33.2 C10_R33.2 C12_R33.2 C20_R33.2 C21_R33.2 C30_R33.2 C31_R33.2 C32_R33.2 C40_R33.2 C42_R33.2 pad.JR1@127.186,109.699 pad.JR3@127.186,111.698 pad.JR6@127.785,109.699 R5_R33.2 R41_R33.2 TH1_R33.2 TH4_R33.2 U1_R33.C4 U1_R33.C5 U1_R33.D2 U1_R33.E3 U1_R33.F5 U2_R33.B2 U3_R33.9 U3_R33.10 U3_R33.11 Y1_R33.2 Y1_R33.4 | length 2.1
  Top Layer w0.15: U1_R33.C4@128.3,111.75 v1(128.3,111.78)
  Top Layer w0.2: C3_R33.2@130.05,112.601 v1(130.05,113.05) ; C42_R33.2@130.53,113.386 v1(130.53,113.786) ; C40_R33.2@131.411,111.555 v1(131.442,111.164)
  Bottom Layer w0.15: v5(127.1,111.6) 127.185,111.685 pad.JR3@127.186,111.698 ; v2(127.176,108.547) 127.228,108.646 U2_R33.B2@127.525,108.645 ; U3_R33.10@129.06,111.1 129.2,111.1 v5(129.3,111)
  other v1: 128.63,107.49 130.03,107.56 131.485,108.55 129.601,108.623 130.256,108.7 131.485,109.05 129.999,109.329 131.485,109.55 129.359,109.675 127.718,109.82 128.88,109.977 128.16,110.023 131.485,110.05 127.723,110.35 130.799,110.431 131.3,110.75 130.6,111.33 127.899,111.81 129.1,112.151 128.699,112.55 127.899,112.949 131.4,113.15 130.47,113.386 131.3,114.275 129.16,114.8 127.172,114.894 128.36,115
  other v2: 127.176,107.815 127.176,115.82
  other v3: 130.751,115.322 127.449,116.076
  other v4: 128.336,107.139 127.529,107.206 127.11,107.35 131.46,114.65 131.306,115.131 130.442,115.725 130.021,115.923 128.01,116.25
  other v5: 130.03,107.56 129.108,107.8 128.524,107.899 128.295,108.45 130.858,108.501 129.66,108.8 128.56,109.2 127.185,109.7 127.784,109.7 130.06,110 129.01,110.49 129.06,111.759 128.46,115.1 127.807,115.75
  other v6: 129.081,107.265 129.26,109.1 130.36,109.6 130.96,110 129.37,110.1 130.06,110.9 128.66,112.1 129.76,112.1 127.42,113.435 128.676,113.774 129.89,114.5 129.135,116.039 128.611,116.069
GND_R34: C1_R34.2 C2_R34.2 C3_R34.2 C4_R34.2 C5_R34.2 C6_R34.2 C7_R34.2 C8_R34.2 C9_R34.2 C10_R34.2 C12_R34.2 C20_R34.2 C21_R34.2 C30_R34.2 C31_R34.2 C32_R34.2 C40_R34.2 C42_R34.2 pad.JR1@146.185,109.699 pad.JR3@146.185,111.698 pad.JR6@146.785,109.699 R5_R34.2 R41_R34.2 TH1_R34.2 TH4_R34.2 U1_R34.C4 U1_R34.C5 U1_R34.D2 U1_R34.E3 U1_R34.F5 U2_R34.B2 U3_R34.9 U3_R34.10 U3_R34.11 Y1_R34.2 Y1_R34.4 | length 2.1
  Top Layer w0.15: U1_R34.C4@147.3,111.75 v1(147.3,111.78)
  Top Layer w0.2: C3_R34.2@149.05,112.601 v1(149.05,113.05) ; C42_R34.2@149.53,113.386 v1(149.53,113.786) ; C40_R34.2@150.411,111.555 v1(150.442,111.164)
  Bottom Layer w0.15: v5(146.1,111.6) 146.185,111.685 pad.JR3@146.185,111.698 ; v2(146.176,108.547) 146.228,108.646 U2_R34.B2@146.525,108.645 ; U3_R34.10@148.06,111.1 148.2,111.1 v5(148.3,111)
  other v1: 147.63,107.49 149.03,107.56 150.485,108.55 148.601,108.623 149.256,108.7 150.485,109.05 148.999,109.329 150.485,109.55 148.359,109.675 146.718,109.82 147.88,109.977 147.16,110.023 150.485,110.05 146.723,110.35 149.799,110.431 150.3,110.75 149.6,111.33 146.899,111.81 148.1,112.151 147.699,112.55 146.899,112.949 150.4,113.15 149.47,113.386 150.3,114.275 148.16,114.8 146.172,114.894 147.36,115
  other v2: 146.176,107.815 146.176,115.82
  other v3: 149.751,115.322 146.449,116.076
  other v4: 147.336,107.139 146.529,107.206 146.11,107.35 150.46,114.65 150.306,115.131 149.442,115.725 149.021,115.923 147.01,116.25
  other v5: 149.03,107.56 148.108,107.8 147.524,107.899 147.295,108.45 149.858,108.501 148.66,108.8 147.56,109.2 146.185,109.7 146.784,109.7 149.06,110 148.01,110.49 148.06,111.759 147.46,115.1 146.807,115.75
  other v6: 148.081,107.265 148.26,109.1 149.36,109.6 149.96,110 148.37,110.1 149.06,110.9 147.66,112.1 148.76,112.1 146.42,113.435 147.676,113.774 148.89,114.5 148.135,116.039 147.611,116.069
GND_R41: C1_R41.2 C2_R41.2 C3_R41.2 C4_R41.2 C5_R41.2 C6_R41.2 C7_R41.2 C8_R41.2 C9_R41.2 C10_R41.2 C12_R41.2 C20_R41.2 C21_R41.2 C30_R41.2 C31_R41.2 C32_R41.2 C40_R41.2 C42_R41.2 pad.JR1@89.185,121.5 pad.JR3@89.185,123.499 pad.JR6@89.784,121.5 R5_R41.2 R41_R41.2 TH1_R41.2 TH4_R41.2 U1_R41.C4 U1_R41.C5 U1_R41.D2 U1_R41.E3 U1_R41.F5 U2_R41.B2 U3_R41.9 U3_R41.10 U3_R41.11 Y1_R41.2 Y1_R41.4 | length 2.1
  Top Layer w0.15: U1_R41.C4@90.3,123.55 v1(90.3,123.58)
  Top Layer w0.2: C3_R41.2@92.05,124.401 v1(92.05,124.85) ; C42_R41.2@92.53,125.186 v1(92.53,125.586) ; C40_R41.2@93.411,123.355 v1(93.442,122.964)
  Bottom Layer w0.15: v5(89.1,123.4) 89.185,123.485 pad.JR3@89.185,123.499 ; v2(89.176,120.347) 89.228,120.446 U2_R41.B2@89.525,120.446 ; U3_R41.10@91.06,122.9 91.2,122.9 v5(91.3,122.8)
  other v1: 90.63,119.29 92.03,119.36 93.485,120.35 91.601,120.423 92.256,120.5 93.485,120.85 91.999,121.129 93.485,121.35 91.359,121.475 89.718,121.62 90.88,121.777 90.16,121.823 93.485,121.85 89.723,122.15 92.799,122.231 93.3,122.55 92.6,123.13 89.899,123.61 91.1,123.951 90.699,124.35 89.899,124.749 93.4,124.95 92.47,125.186 93.3,126.075 91.16,126.6 89.172,126.694 90.36,126.8
  other v2: 89.176,119.615 89.176,127.62
  other v3: 92.751,127.122 89.449,127.876
  other v4: 90.336,118.939 89.529,119.006 89.11,119.15 93.46,126.45 93.306,126.931 92.442,127.525 92.021,127.723 90.01,128.05
  other v5: 92.03,119.36 91.108,119.6 90.524,119.699 90.295,120.25 92.858,120.301 91.66,120.6 90.56,121 89.185,121.5 89.784,121.5 92.06,121.8 91.01,122.29 91.06,123.559 90.46,126.9 89.807,127.55
  other v6: 91.081,119.065 91.26,120.9 92.36,121.4 92.96,121.8 91.37,121.9 92.06,122.7 90.66,123.9 91.76,123.9 89.42,125.235 90.676,125.574 91.89,126.3 91.135,127.839 90.611,127.869
GND_R42: C1_R42.2 C2_R42.2 C3_R42.2 C4_R42.2 C5_R42.2 C6_R42.2 C7_R42.2 C8_R42.2 C9_R42.2 C10_R42.2 C12_R42.2 C20_R42.2 C21_R42.2 C30_R42.2 C31_R42.2 C32_R42.2 C40_R42.2 C42_R42.2 pad.JR1@108.184,121.5 pad.JR3@108.184,123.499 pad.JR6@108.784,121.5 R5_R42.2 R41_R42.2 TH1_R42.2 TH4_R42.2 U1_R42.C4 U1_R42.C5 U1_R42.D2 U1_R42.E3 U1_R42.F5 U2_R42.B2 U3_R42.9 U3_R42.10 U3_R42.11 Y1_R42.2 Y1_R42.4 | length 2.1
  Top Layer w0.15: U1_R42.C4@109.3,123.55 v1(109.3,123.58)
  Top Layer w0.2: C3_R42.2@111.05,124.401 v1(111.05,124.85) ; C42_R42.2@111.53,125.186 v1(111.53,125.586) ; C40_R42.2@112.412,123.354 v1(112.442,122.964)
  Bottom Layer w0.15: v5(108.1,123.4) 108.185,123.485 pad.JR3@108.185,123.499 ; v2(108.176,120.347) 108.228,120.446 U2_R42.B2@108.525,120.446 ; U3_R42.10@110.06,122.9 110.2,122.9 v5(110.3,122.8)
  other v1: 109.63,119.29 111.03,119.36 112.485,120.35 110.601,120.423 111.256,120.5 112.485,120.85 110.999,121.129 112.485,121.35 110.359,121.475 108.718,121.62 109.88,121.777 109.16,121.823 112.485,121.85 108.723,122.15 111.799,122.231 112.3,122.55 111.6,123.13 108.899,123.61 110.1,123.951 109.699,124.35 108.899,124.749 112.4,124.95 111.47,125.186 112.3,126.075 110.16,126.6 108.172,126.694 109.36,126.8
  other v2: 108.176,119.615 108.176,127.62
  other v3: 111.751,127.122 108.449,127.876
  other v4: 109.336,118.939 108.529,119.006 108.11,119.15 112.46,126.45 112.306,126.931 111.442,127.525 111.021,127.723 109.01,128.05
  other v5: 111.03,119.36 110.108,119.6 109.524,119.699 109.295,120.25 111.858,120.301 110.66,120.6 109.56,121 108.185,121.5 108.784,121.5 111.06,121.8 110.01,122.29 110.06,123.559 109.46,126.9 108.807,127.55
  other v6: 110.081,119.065 110.26,120.9 111.36,121.4 111.96,121.8 110.37,121.9 111.06,122.7 109.66,123.9 110.76,123.9 108.42,125.235 109.676,125.574 110.89,126.3 110.135,127.839 109.611,127.869
GND_R43: C1_R43.2 C2_R43.2 C3_R43.2 C4_R43.2 C5_R43.2 C6_R43.2 C7_R43.2 C8_R43.2 C9_R43.2 C10_R43.2 C12_R43.2 C20_R43.2 C21_R43.2 C30_R43.2 C31_R43.2 C32_R43.2 C40_R43.2 C42_R43.2 pad.JR1@127.186,121.5 pad.JR3@127.186,123.499 pad.JR6@127.785,121.5 R5_R43.2 R41_R43.2 TH1_R43.2 TH4_R43.2 U1_R43.C4 U1_R43.C5 U1_R43.D2 U1_R43.E3 U1_R43.F5 U2_R43.B2 U3_R43.9 U3_R43.10 U3_R43.11 Y1_R43.2 Y1_R43.4 | length 2.1
  Top Layer w0.15: U1_R43.C4@128.3,123.55 v1(128.3,123.58)
  Top Layer w0.2: C3_R43.2@130.05,124.401 v1(130.05,124.85) ; C42_R43.2@130.53,125.186 v1(130.53,125.586) ; C40_R43.2@131.411,123.355 v1(131.442,122.964)
  Bottom Layer w0.15: v5(127.1,123.4) 127.185,123.485 pad.JR3@127.186,123.499 ; v2(127.176,120.347) 127.228,120.446 U2_R43.B2@127.525,120.446 ; U3_R43.10@129.06,122.9 129.2,122.9 v5(129.3,122.8)
  other v1: 128.63,119.29 130.03,119.36 131.485,120.35 129.601,120.423 130.256,120.5 131.485,120.85 129.999,121.129 131.485,121.35 129.359,121.475 127.718,121.62 128.88,121.777 128.16,121.823 131.485,121.85 127.723,122.15 130.799,122.231 131.3,122.55 130.6,123.13 127.899,123.61 129.1,123.951 128.699,124.35 127.899,124.749 131.4,124.95 130.47,125.186 131.3,126.075 129.16,126.6 127.172,126.694 128.36,126.8
  other v2: 127.176,119.615 127.176,127.62
  other v3: 130.751,127.122 127.449,127.876
  other v4: 128.336,118.939 127.529,119.006 127.11,119.15 131.46,126.45 131.306,126.931 130.442,127.525 130.021,127.723 128.01,128.05
  other v5: 130.03,119.36 129.108,119.6 128.524,119.699 128.295,120.25 130.858,120.301 129.66,120.6 128.56,121 127.185,121.5 127.784,121.5 130.06,121.8 129.01,122.29 129.06,123.559 128.46,126.9 127.807,127.55
  other v6: 129.081,119.065 129.26,120.9 130.36,121.4 130.96,121.8 129.37,121.9 130.06,122.7 128.66,123.9 129.76,123.9 127.42,125.235 128.676,125.574 129.89,126.3 129.135,127.839 128.611,127.869
GND_R44: C1_R44.2 C2_R44.2 C3_R44.2 C4_R44.2 C5_R44.2 C6_R44.2 C7_R44.2 C8_R44.2 C9_R44.2 C10_R44.2 C12_R44.2 C20_R44.2 C21_R44.2 C30_R44.2 C31_R44.2 C32_R44.2 C40_R44.2 C42_R44.2 pad.JR1@146.185,121.5 pad.JR3@146.185,123.499 pad.JR6@146.785,121.5 R5_R44.2 R41_R44.2 TH1_R44.2 TH4_R44.2 U1_R44.C4 U1_R44.C5 U1_R44.D2 U1_R44.E3 U1_R44.F5 U2_R44.B2 U3_R44.9 U3_R44.10 U3_R44.11 Y1_R44.2 Y1_R44.4 | length 2.1
  Top Layer w0.15: U1_R44.C4@147.3,123.55 v1(147.3,123.58)
  Top Layer w0.2: C3_R44.2@149.05,124.401 v1(149.05,124.85) ; C42_R44.2@149.53,125.186 v1(149.53,125.586) ; C40_R44.2@150.411,123.355 v1(150.442,122.964)
  Bottom Layer w0.15: v5(146.1,123.4) 146.185,123.485 pad.JR3@146.185,123.499 ; v2(146.176,120.347) 146.228,120.446 U2_R44.B2@146.525,120.446 ; U3_R44.10@148.06,122.9 148.2,122.9 v5(148.3,122.8)
  other v1: 147.63,119.29 149.03,119.36 150.485,120.35 148.601,120.423 149.256,120.5 150.485,120.85 148.999,121.129 150.485,121.35 148.359,121.475 146.718,121.62 147.88,121.777 147.16,121.823 150.485,121.85 146.723,122.15 149.799,122.231 150.3,122.55 149.6,123.13 146.899,123.61 148.1,123.951 147.699,124.35 146.899,124.749 150.4,124.95 149.47,125.186 150.3,126.075 148.16,126.6 146.172,126.694 147.36,126.8
  other v2: 146.176,119.615 146.176,127.62
  other v3: 149.751,127.122 146.449,127.876
  other v4: 147.336,118.939 146.529,119.006 146.11,119.15 150.46,126.45 150.306,126.931 149.442,127.525 149.021,127.723 147.01,128.05
  other v5: 149.03,119.36 148.108,119.6 147.524,119.699 147.295,120.25 149.858,120.301 148.66,120.6 147.56,121 146.185,121.5 146.784,121.5 149.06,121.8 148.01,122.29 148.06,123.559 147.46,126.9 146.807,127.55
  other v6: 148.081,119.065 148.26,120.9 149.36,121.4 149.96,121.8 148.37,121.9 149.06,122.7 147.66,123.9 148.76,123.9 146.42,125.235 147.676,125.574 148.89,126.3 148.135,127.839 147.611,127.869
GND_R51: C1_R51.2 C2_R51.2 C3_R51.2 C4_R51.2 C5_R51.2 C6_R51.2 C7_R51.2 C8_R51.2 C9_R51.2 C10_R51.2 C12_R51.2 C20_R51.2 C21_R51.2 C30_R51.2 C31_R51.2 C32_R51.2 C40_R51.2 C42_R51.2 pad.JR1@89.185,133.301 pad.JR3@89.185,135.3 pad.JR6@89.784,133.301 R5_R51.2 R41_R51.2 TH1_R51.2 TH4_R51.2 U1_R51.C4 U1_R51.C5 U1_R51.D2 U1_R51.E3 U1_R51.F5 U2_R51.B2 U3_R51.9 U3_R51.10 U3_R51.11 Y1_R51.2 Y1_R51.4 | length 2.1
  Top Layer w0.15: U1_R51.C4@90.3,135.35 v1(90.3,135.38)
  Top Layer w0.2: C3_R51.2@92.05,136.201 v1(92.05,136.65) ; C42_R51.2@92.53,136.986 v1(92.53,137.386) ; C40_R51.2@93.412,135.154 v1(93.442,134.764)
  Bottom Layer w0.15: v5(89.1,135.2) 89.185,135.285 pad.JR3@89.185,135.299 ; v2(89.176,132.147) 89.228,132.246 U2_R51.B2@89.525,132.245 ; U3_R51.10@91.06,134.7 91.2,134.7 v5(91.3,134.6)
  other v1: 90.63,131.09 92.03,131.16 93.485,132.15 91.601,132.223 92.256,132.3 93.485,132.65 91.999,132.929 93.485,133.15 91.359,133.275 89.718,133.42 90.88,133.577 90.16,133.623 93.485,133.65 89.723,133.95 92.799,134.031 93.3,134.35 92.6,134.93 89.899,135.41 91.1,135.751 90.699,136.15 89.899,136.549 93.4,136.75 92.47,136.986 93.3,137.875 91.16,138.4 89.172,138.494 90.36,138.6
  other v2: 89.176,131.415 89.176,139.42
  other v3: 92.751,138.922 89.449,139.676
  other v4: 90.336,130.739 89.529,130.806 89.11,130.95 93.46,138.25 93.306,138.731 92.442,139.325 92.021,139.523 90.01,139.85
  other v5: 92.03,131.16 91.108,131.4 90.524,131.499 90.295,132.05 92.858,132.101 91.66,132.4 90.56,132.8 89.185,133.3 89.784,133.3 92.06,133.6 91.01,134.09 91.06,135.359 90.46,138.7 89.807,139.35
  other v6: 91.081,130.865 91.26,132.7 92.36,133.2 92.96,133.6 91.37,133.7 92.06,134.5 90.66,135.7 91.76,135.7 89.42,137.035 90.676,137.374 91.89,138.1 91.135,139.639 90.611,139.669
GND_R52: C1_R52.2 C2_R52.2 C3_R52.2 C4_R52.2 C5_R52.2 C6_R52.2 C7_R52.2 C8_R52.2 C9_R52.2 C10_R52.2 C12_R52.2 C20_R52.2 C21_R52.2 C30_R52.2 C31_R52.2 C32_R52.2 C40_R52.2 C42_R52.2 pad.JR1@108.184,133.301 pad.JR3@108.184,135.3 pad.JR6@108.784,133.301 R5_R52.2 R41_R52.2 TH1_R52.2 TH4_R52.2 U1_R52.C4 U1_R52.C5 U1_R52.D2 U1_R52.E3 U1_R52.F5 U2_R52.B2 U3_R52.9 U3_R52.10 U3_R52.11 Y1_R52.2 Y1_R52.4 | length 2.1
  Top Layer w0.15: U1_R52.C4@109.3,135.35 v1(109.3,135.38)
  Top Layer w0.2: C3_R52.2@111.05,136.201 v1(111.05,136.65) ; C42_R52.2@111.53,136.986 v1(111.53,137.386) ; C40_R52.2@112.412,135.154 v1(112.442,134.764)
  Bottom Layer w0.15: v5(108.1,135.2) 108.185,135.285 pad.JR3@108.185,135.299 ; v2(108.176,132.147) 108.228,132.246 U2_R52.B2@108.525,132.245 ; U3_R52.10@110.06,134.7 110.2,134.7 v5(110.3,134.6)
  other v1: 109.63,131.09 111.03,131.16 112.485,132.15 110.601,132.223 111.256,132.3 112.485,132.65 110.999,132.929 112.485,133.15 110.359,133.275 108.718,133.42 109.88,133.577 109.16,133.623 112.485,133.65 108.723,133.95 111.799,134.031 112.3,134.35 111.6,134.93 108.899,135.41 110.1,135.751 109.699,136.15 108.899,136.549 112.4,136.75 111.47,136.986 112.3,137.875 110.16,138.4 108.172,138.494 109.36,138.6
  other v2: 108.176,131.415 108.176,139.42
  other v3: 111.751,138.922 108.449,139.676
  other v4: 109.336,130.739 108.529,130.806 108.11,130.95 112.46,138.25 112.306,138.731 111.442,139.325 111.021,139.523 109.01,139.85
  other v5: 111.03,131.16 110.108,131.4 109.524,131.499 109.295,132.05 111.858,132.101 110.66,132.4 109.56,132.8 108.185,133.3 108.784,133.3 111.06,133.6 110.01,134.09 110.06,135.359 109.46,138.7 108.807,139.35
  other v6: 110.081,130.865 110.26,132.7 111.36,133.2 111.96,133.6 110.37,133.7 111.06,134.5 109.66,135.7 110.76,135.7 108.42,137.035 109.676,137.374 110.89,138.1 110.135,139.639 109.611,139.669